# Altium PCB PCB1.PcbDoc
Units mm, origin at the board's own origin, x right, y up, seen from the top; angles counter-clockwise.
Board outline 58.8 x 70.36 mm, 2 copper layers (Top Layer, Bottom Layer); 40 components, 28 nets, 138 pads, 40 vias.
Unrouted connection lines stored in the file: 29.
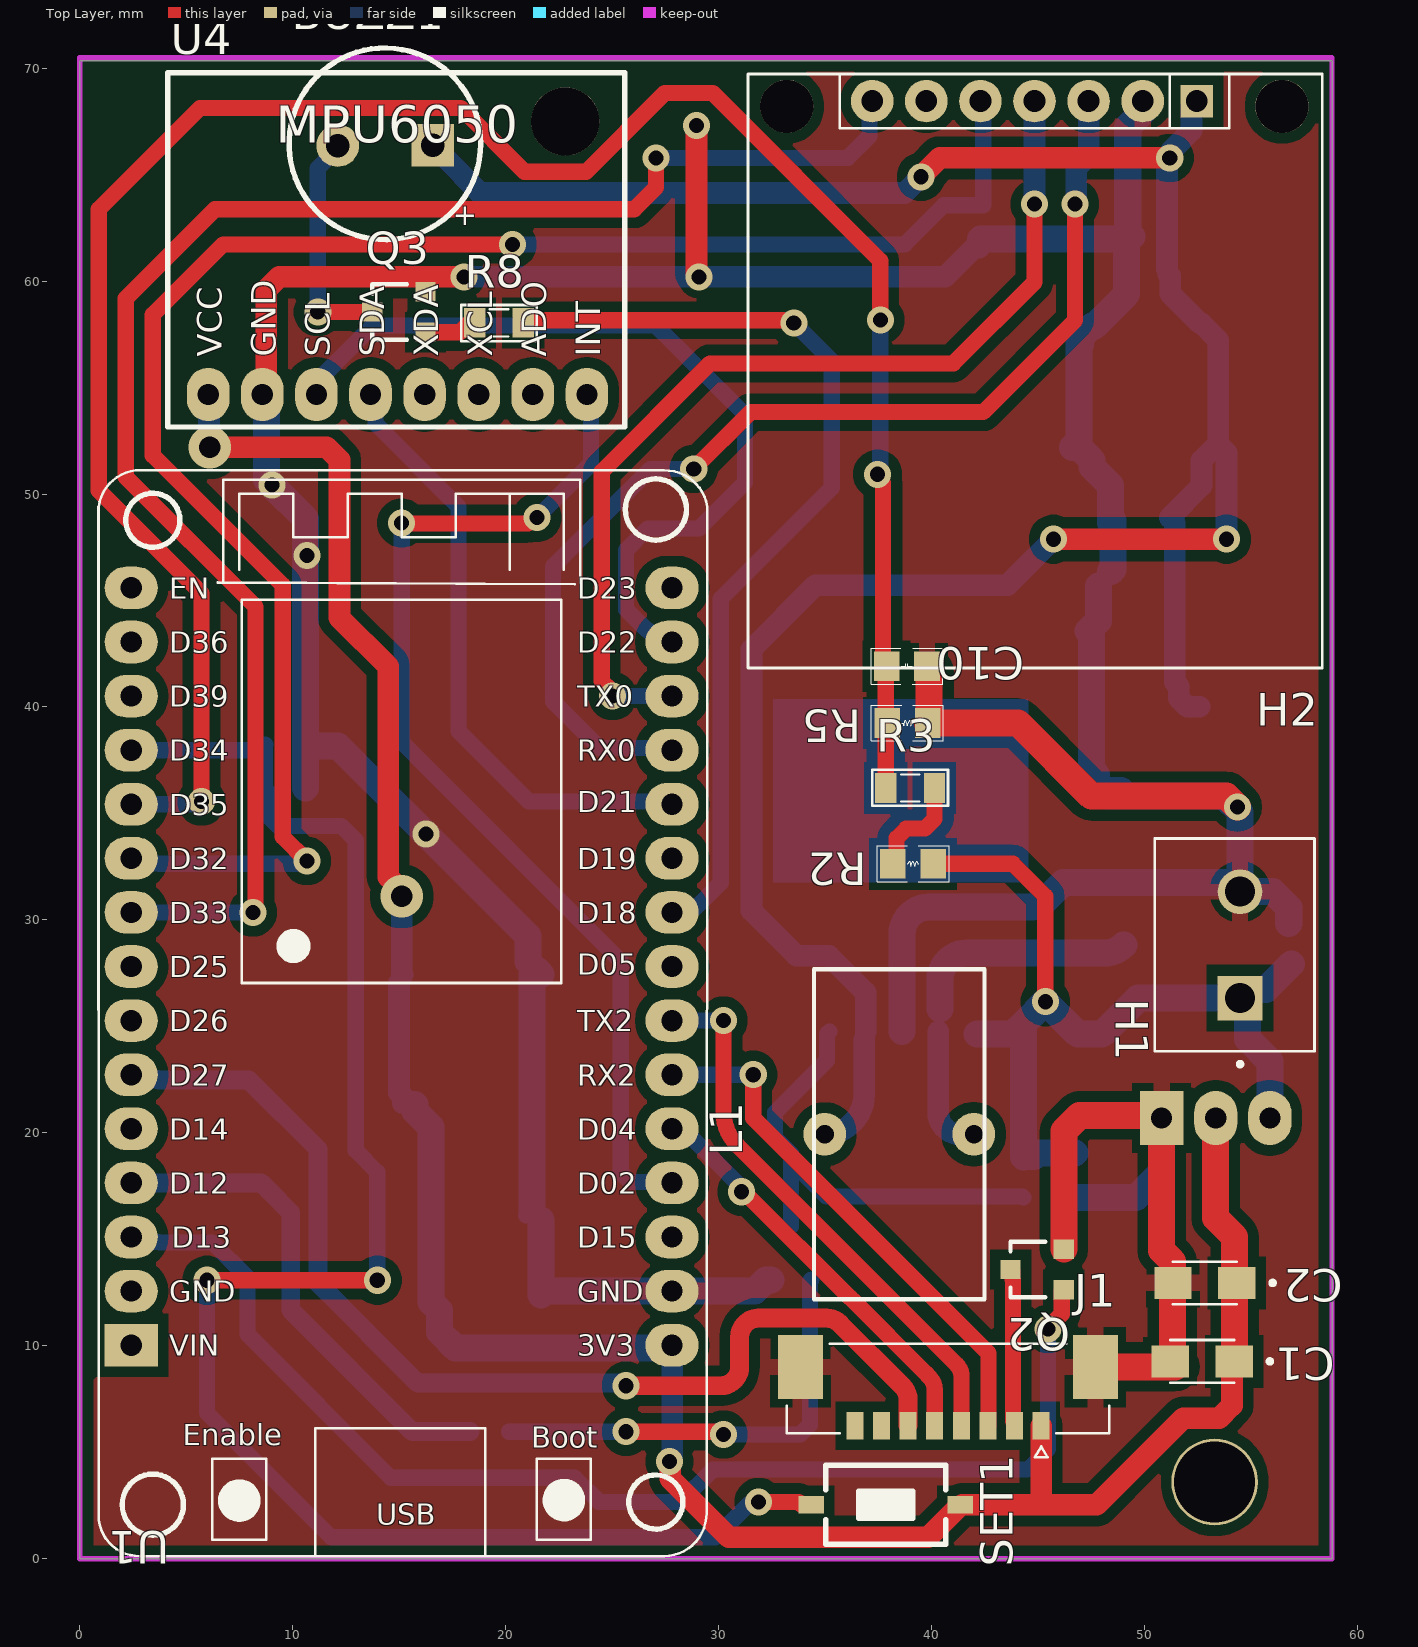
[diagram p0: Top Layer view]
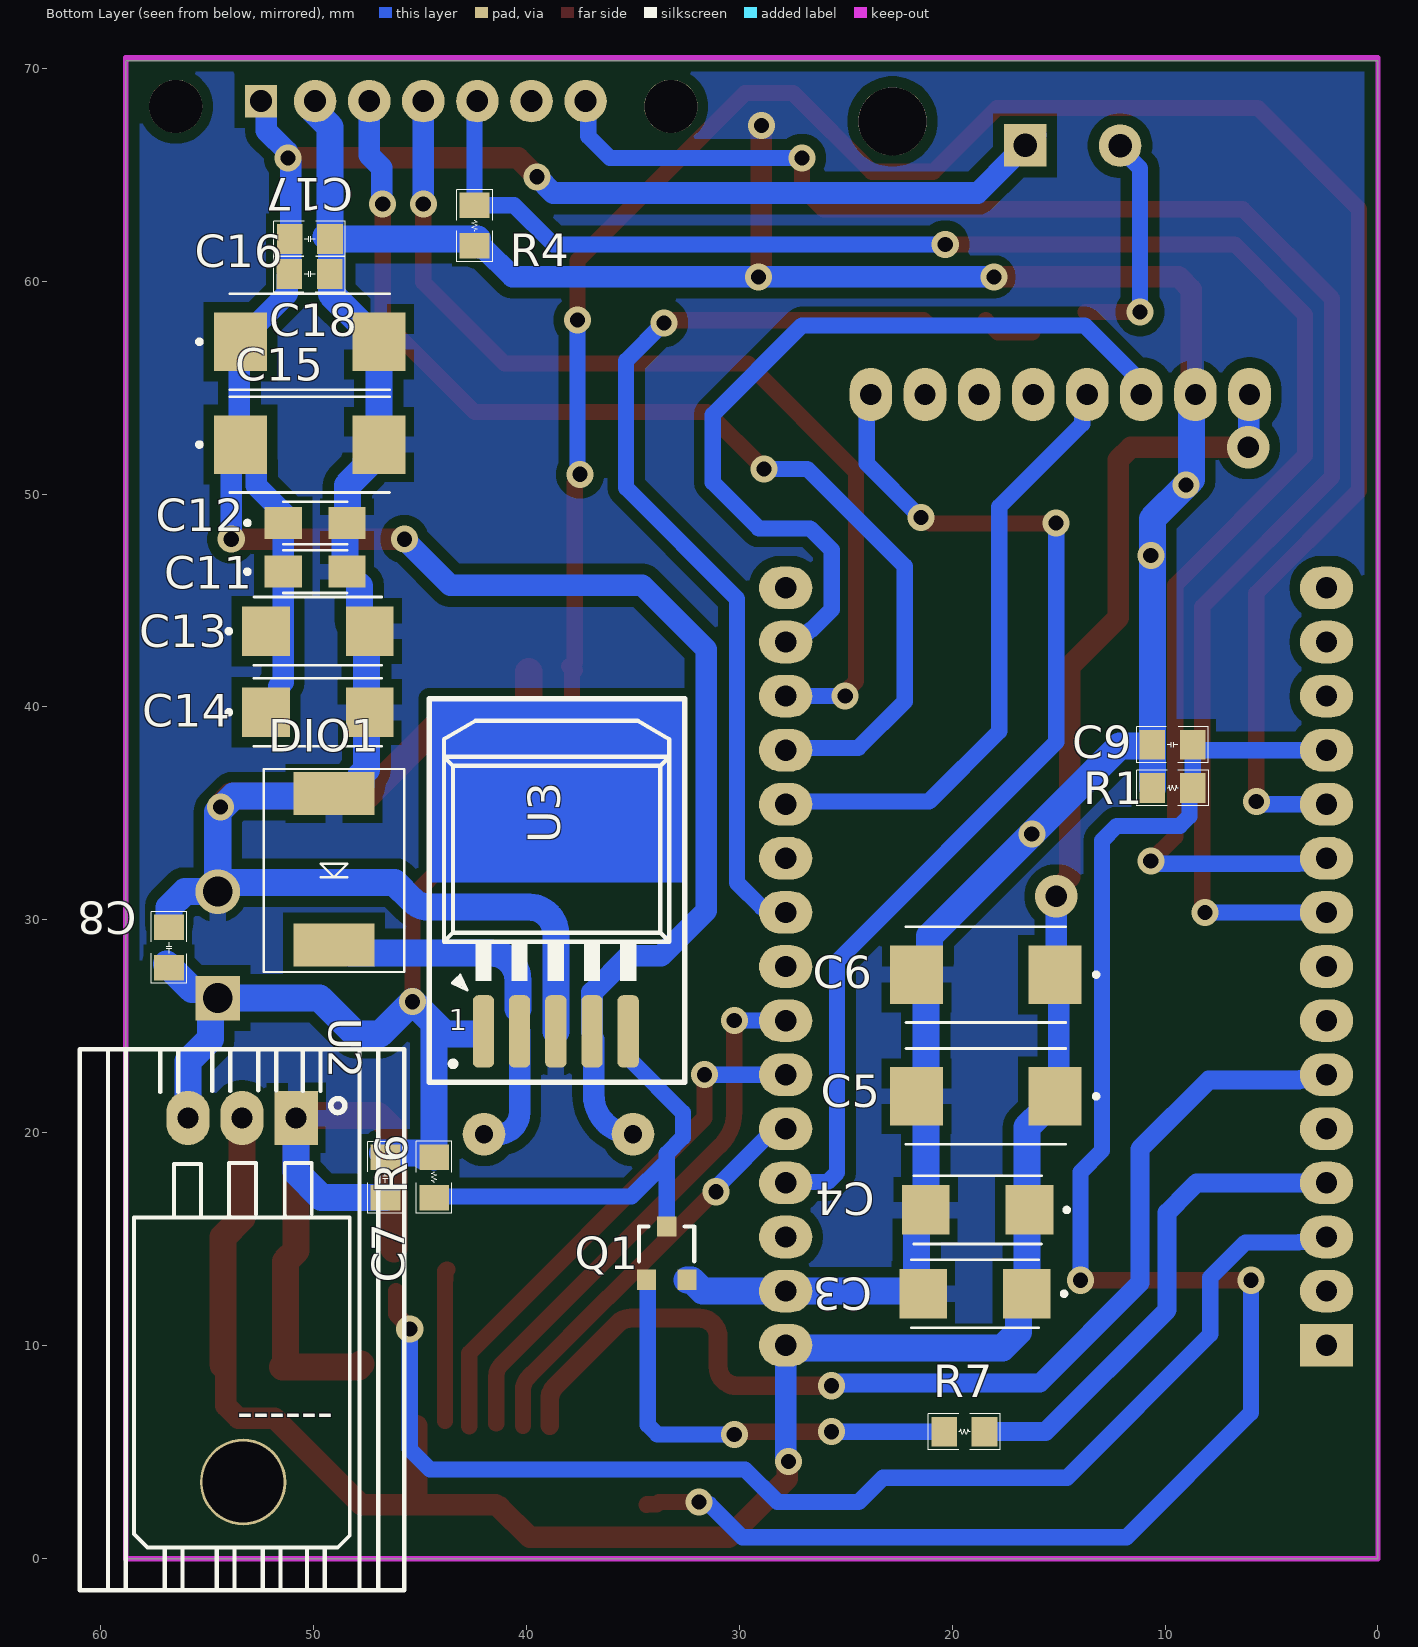
[diagram p1: Bottom Layer view, seen from below]
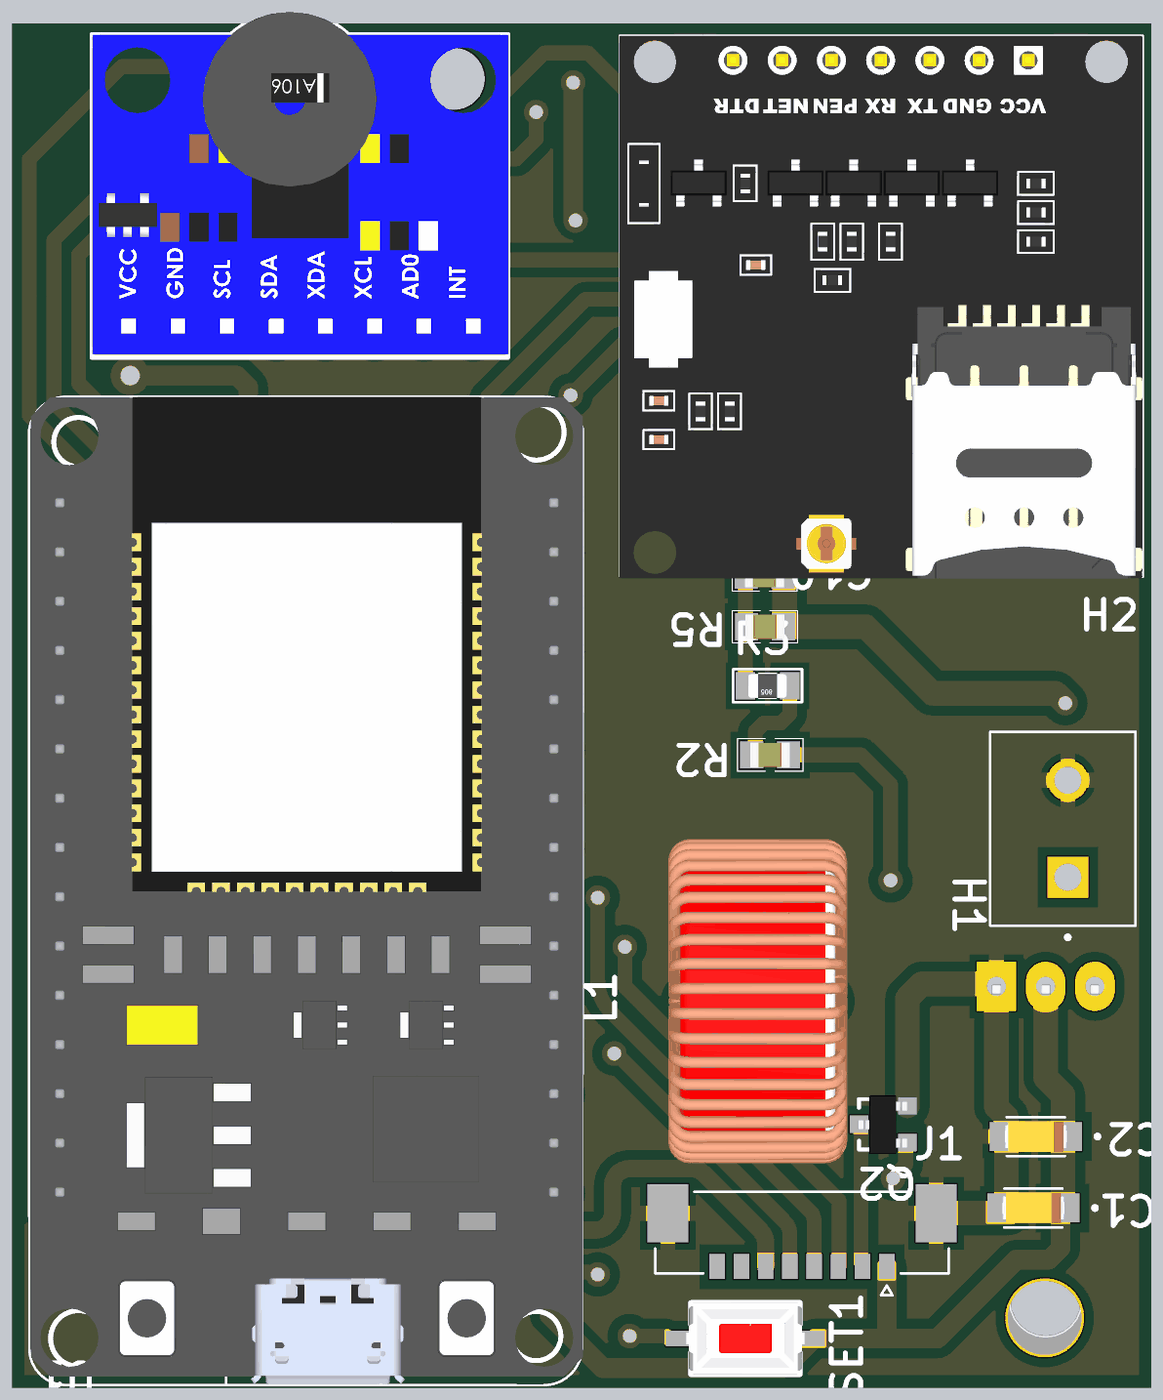
[diagram p2: 3D render of the assembled board from above, using the file's embedded part models]
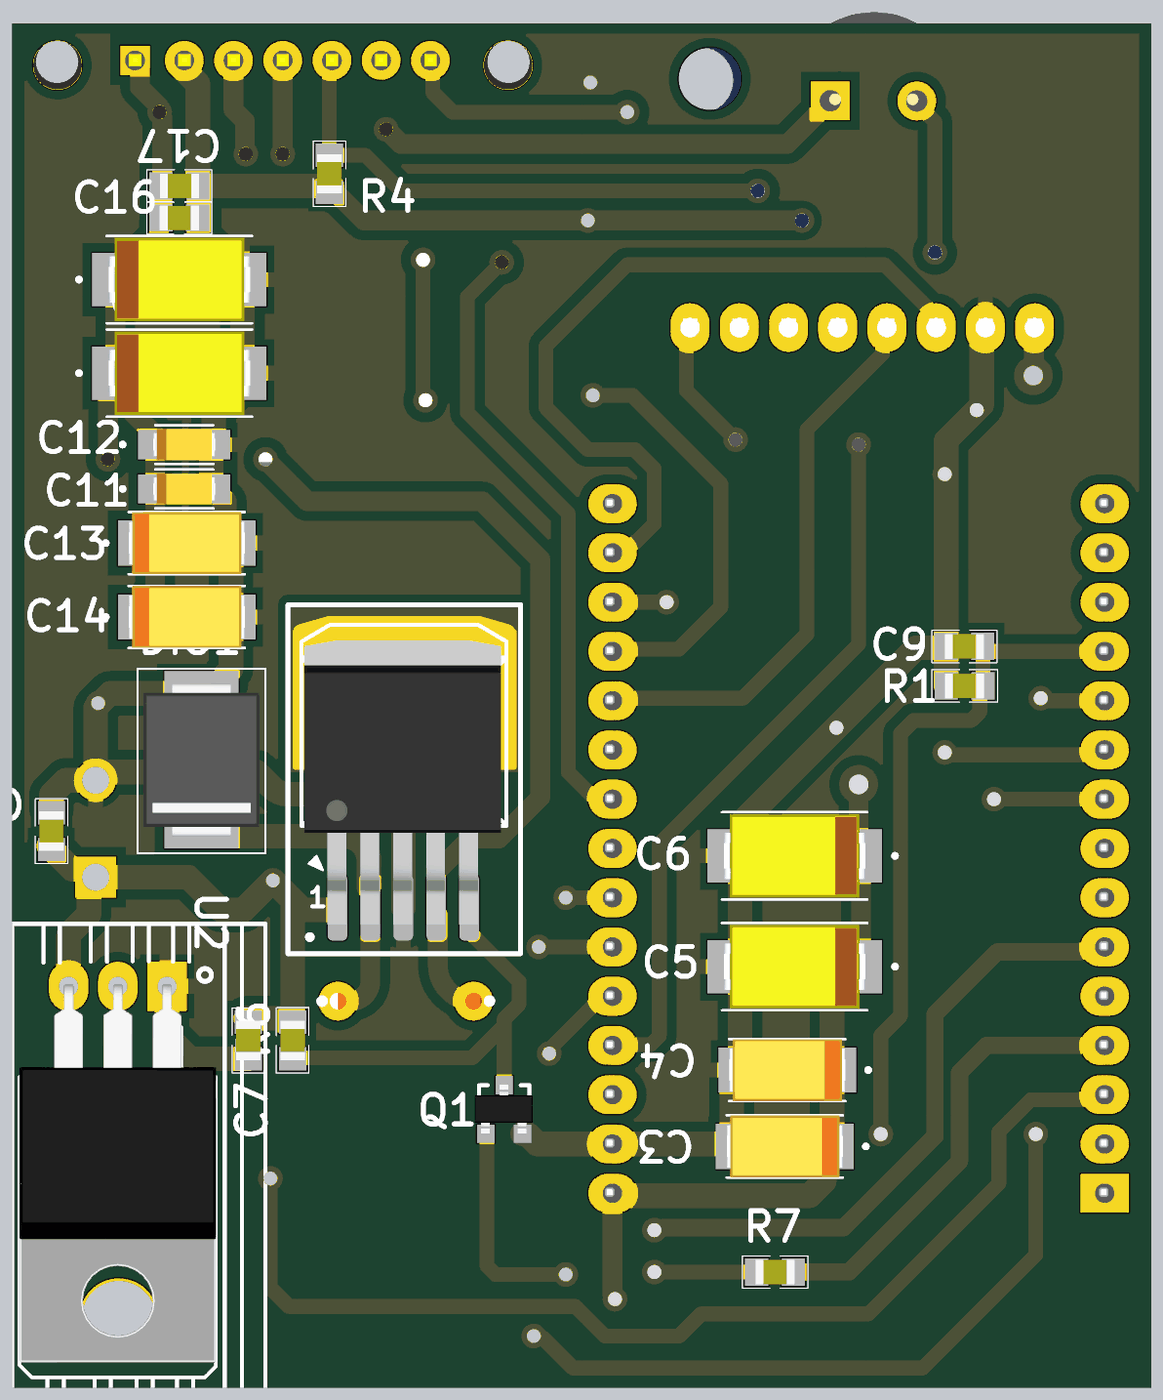
[diagram p3: 3D render of the assembled board from below, using the file's embedded part models]

## Layer stack, top to bottom
Top Solder: solder mask 0.0102, Solder Resist, Dk 3.5
Top Layer: signal copper 0.0356
Dielectric 1: dielectric 0.32, FR-4, Dk 4.8
Bottom Layer: signal copper 0.0356
Bottom Solder: solder mask 0.0102, Solder Resist, Dk 3.5

## Board outline
58.801,0 34.163,0 0,0 0,70.358 58.801,70.358

## Design rules (kind name [scope] priority, off if disabled: settings)
BoardOutlineClearance [All] p1: gap=0.2 ignorepadtopadclearanceinfootprint=FALSE
Clearance [All] p1: gap=0.508 ignorepadtopadclearanceinfootprint=FALSE except(0.25: Arc-Hole Track-Hole SMDPad-Hole THPad-Hole Via-Hole Fill-Hole Poly-Hole Region-Hole Text-Hole; 0.254: Arc-SMDPad Track-SMDPad SMDPad-SMDPad; 0.381: Arc-Arc Arc-Track Arc-THPad Arc-Via Arc-Text Track-Track Track-THPad Track-Via Track-Text SMDPad-THPad SMDPad-Via SMDPad-Text THPad-THPad THPad-Via THPad-Text Via-Via Via-Text Fill-Text Poly-Text Region-Text Text-Text)
ComponentClearance [All] p1: gap=0.127 collisioncheckmode=3 verticalgap=0.127 showdistances=TRUE
DiffPairsRouting [All] p1: maxlimit=0.254 minlimit=0.127 mostfreqgap=0.127 toplayer_minwidth=0.127 toplayer_maxwidth=25.4 toplayer_prefwidth=0.127 bottomlayer_minwidth=0.127 bottomlayer_maxwidth=25.4 bottomlayer_prefwidth=0.127 maxuncoupledlength=12.7
Height [All] p1: minheight=0 maxheight=1816.048 prefheight=12.7
HoleSize [All] p1: absolutevalues=TRUE maxlimit=6.3 minlimit=0.3 maxpercent=80.000 minpercent=20.000
HoleToHoleClearance [All] p1: gap=0.25 allowstackedmicrovias=FALSE
MinimumAnnularRing [All] p1: minimumring=0.076
MinimumSolderMaskSliver [All] p1: minsoldermaskwidth=0
PlaneClearance [All] p1: clearance=0.127
PlaneConnect PlaneConnectPowerPads [InPadClass('PowerPads')] p1: planeconnectstyle=Relief reliefexpansion=0.508 reliefentries=4 reliefconductorwidth=0.254 reliefairgap=0.254
PlaneConnect [All] p2: planeconnectstyle=Relief reliefexpansion=0.3 reliefentries=4 reliefconductorwidth=0.381 reliefairgap=0.127
PolygonConnect PolygonConnectPowerPads [All vs (InPadClass('PowerPads'))] p1: thpad.connectstyle=Direct thpad.reliefconductorwidth=0.254 thpad.reliefentries=4 thpad.polygonreliefangle="90 Angle" thpad.airgapwidth=0.254 smdpad.connectstyle=Direct smdpad.reliefconductorwidth=0.254 smdpad.reliefentries=4 smdpad.polygonreliefangle="90 Angle" smdpad.airgapwidth=0.254 via.connectstyle=Relief via.reliefconductorwidth=0.254 via.reliefentries=4 via.polygonreliefangle="90 Angle" via.airgapwidth=0.254
PolygonConnect [All] p2: thpad.connectstyle=Relief thpad.reliefconductorwidth=0.762 thpad.reliefentries=4 thpad.polygonreliefangle="90 Angle" thpad.airgapwidth=0.381 smdpad.connectstyle=Relief smdpad.reliefconductorwidth=0.762 smdpad.reliefentries=4 smdpad.polygonreliefangle="90 Angle" smdpad.airgapwidth=0.381 via.connectstyle=Direct via.reliefconductorwidth=0.762 via.reliefentries=4 via.polygonreliefangle="90 Angle" via.airgapwidth=0.381
RoutingVias [All] p1: holewidth=1 width=2 viastyle="Through Hole" minholewidth=1 minwidth=2 maxholewidth=1 maxwidth=2
SilkToSilkClearance [All] p1: silktosilkclearance=0
SilkToSolderMaskClearance [IsPad] p1: minsilkscreentomaskgap=0.025 clearancetoexposedcopper=TRUE
SolderMaskExpansion SolderMaskExpansion_Via [IsVia] p1: expansion=0.102 istentingtop=TRUE
SolderMaskExpansion [All] p2: expansion=0.075 istentingtop=FALSE
Width [All] p1: maxlimit=1.27 minlimit=0.762 preferedwidth=0.889
20 further rules are at their usual default settings.

## Components (designator, comment, footprint, x,y, rotation, side; value= is the part's Value field where it differs from the comment)
BUZZ1 "BZ 5V" BUZ_9MM 14.351,66.421 r180 top
C1 "OPT" 1206_Tantalum 52.705,9.271 r180 top
C2 "OPT" 1206_Tantalum 52.832,12.954 r180 top
C3 "OPT" 2312_Tantalum 18.923,12.446 r0 bottom
C4 "OPT" 2312_Tantalum 18.796,16.383 r0 bottom
C5 "100uF" "2917 _Tantalum" 18.415,21.717 r0 bottom
C6 "100uF" "2917 _Tantalum" 18.415,27.432 r0 bottom
C7 "10uF" 0805_Cap 46.609,17.907 r90 bottom
C8 "22uF" 0805_Cap 56.769,28.702 r90 bottom
C9 "10uF" 0805_Cap 9.652,38.227 r0 bottom
C10 "100nF" 0805_Cap 38.837,41.91 r180 top
C11 "OPT" 1206_Tantalum 49.911,46.355 r180 bottom
C12 "OPT" 1206_Tantalum 49.911,48.641 r180 bottom
C13 "OPT" 2312_Tantalum 49.784,43.561 r180 bottom
C14 "OPT" 2312_Tantalum 49.784,39.751 r180 bottom
C15 "100uF" "2917 _Tantalum" 50.165,52.324 r180 bottom
C16 "100uF" "2917 _Tantalum" 50.165,57.15 r180 bottom
C17 "100nF" 0805_Cap 50.165,61.976 r180 bottom
C18 "10uF" 0805_Cap 50.165,60.325 r0 bottom
DIO1 "Diode SMD" DIO-SMD-A 49.022,32.639 r90 bottom value=1N5007
H1 "KF301-2P" HANDSON_KF301-2P 54.483,28.829 r90 top
H2 "A7680C" "Module A7680C" 52.451,68.453 r180 top
J1 "533980871" MOLEX_533980871 40.767,8.001 r0 top
L1 "L-DIP-1" L-DIP-M-15.5x8 38.481,19.939 r180 top value="150 mH"
Q1 "Si2302DS" SOT23-132#1 33.401,14.351 r180 bottom
Q2 "Si2302DS" SOT23-132#2 44.958,13.589 r90 top
Q3 "2SC1815" SOT23-321 14.986,58.547 r90 top value=C1815
R1 "10K" 0805_Res 9.652,36.195 r180 bottom
R2 "500 ohm" 0805_Res 39.116,32.639 r0 top
R3 "15k" RES-SMD-0805 38.989,36.195 r180 top
R4 "10K" 0805_Res 42.418,62.611 r270 bottom
R5 "10k" 0805_Res 38.862,39.243 r180 top
R6 "10K" 0805_Res 44.323,17.907 r90 bottom
R7 "10k" 0805_Res 19.431,5.969 r180 bottom
R8 "330" RES-SMD-0805 19.685,58.039 r0 top
SET1 "Button 2p" "Button 2p 3x6x2.5" 37.846,2.54 r0 top
U1 "ESP32_30" ESP32_30 15.113,27.813 r0 top
U2 "LM1117-3.3V" TO220NH 50.8,20.701 r0 bottom
U3 "LM2976" TO263 38.989,30.734 r180 bottom
U4 "MPU6050" MPU6050 14.859,61.468 r0 top

## Footprints (in the part's own frame and the unit in brackets; to place one, negate y for a bottom-side part, rotate by r counter-clockwise, add the part's x,y. Pads: shape width x height; smd on the part's side, far side on the other; paste and mask are expansions set on the pad)
0805_Cap [mm]
  rect 1.2x1.4 smd: 1(-0.946,-0.003) 2(0.954,-0.003)
  silkscreen extent -1.68,-0.84 1.68,0.84, body extent -1.01,-0.64 1.01,0.63, height 0.61
0805_Res [mm]
  rect 1.2x1.4 smd: 1(-0.946,-0.003) 2(0.954,-0.003)
  silkscreen extent -1.68,-0.84 1.7,0.84, body extent -1.01,-0.64 1.01,0.63, height 0.61
1206_Tantalum [mm]
  rect 1.75x1.5 smd: 1(-1.5,0) 2(1.5,0)
  silkscreen extent -3.28,-1 1.5,1, body extent -1.6,-0.8 1.6,0.8, height 1.8
2312_Tantalum [mm]
  rect 2.24x2.32 smd: 1(-2.435,0) 2(2.435,0)
  silkscreen extent -4.28,-1.6 3,1.6, body extent -3,-1.6 3,1.6, height 2.8
"2917 _Tantalum" [mm]
  rect 2.5x2.75 smd: 1(-3.25,0) 2(3.25,0)
  silkscreen extent -5.28,-2.25 3.75,2.25, body extent -3.65,-2.15 3.65,2.15, height 3.1
"Button 2p 3x6x2.5" [mm]
  rect 1.2x0.8 smd: 1(-3.5,0) 2(3.5,0)
  silkscreen extent -2.82,-1.85 2.82,1.85, body extent -3.05,-1.85 3.05,1.85, height 2.5
BUZ_9MM [mm]
  rect 2x2 hole 1.1: 1(-2.22,0.05)
  round 2 hole 1.1: 2(2.24,0.06)
  silkscreen extent -4.47,-4.52 4.52,4.47, body extent -4.47,-4.53 4.53,4.47, height 4.8
DIO-SMD-A [mil]
  rect 80x150 smd: 1(130,0) 2(-150,0)
  silkscreen extent -200,-130 175,130, body extent -166,-118 146,118, height 84
ESP32_30 [mm] "Microcontoller Board 30 Pins Wifi 2.4GHz BLE 4.2 ESP32-WROOM-32D"
  oval 2.5x2 hole 1: 1(-12.7,17.78) 2(-12.7,15.24) 3(-12.7,12.7) 4(-12.7,10.16) 5(-12.7,7.62) 6(-12.7,5.08) 7(-12.7,2.54) 8(-12.7,0) 9(-12.7,-2.54) 10(-12.7,-5.08) 11(-12.7,-7.62) 12(-12.7,-10.16) 13(-12.7,-12.7) 14(-12.7,-15.24) 16(12.7,17.78) 17(12.7,15.24) 18(12.7,12.7) 19(12.7,10.16) 20(12.7,7.62) 21(12.7,5.08) 22(12.7,2.54) 23(12.7,0) 24(12.7,-2.54) 25(12.7,-5.08) 26(12.7,-7.62) 27(12.7,-10.16) 28(12.7,-12.7) 29(12.7,-15.24) 30(12.7,-17.78)
  rect 2.5x2 hole 1: 15(-12.7,-17.78)
  silkscreen extent -14.23,-27.69 14.35,23.31, body extent -14.15,-27.61 14.35,23.29, height 7
HANDSON_KF301-2P [mm]
  rect 2.1x2.1 hole 1.4: 1(-2.5,0)
  round 2.1 hole 1.4: 2(2.5,0)
  silkscreen extent -5.7,-3.5 5,4
L-DIP-M-15.5x8 [mm] "Body 15.5x8mm, 2 leads"
  round 2 hole 0.85: 1(-3.5,0) 2(3.5,0)
  silkscreen extent -4,-7.75 4,7.75, body extent -4.62,-8.36 4.62,8.36, height 16.84
"Module A7680C" [mm] "Footprint for A7680C"
  rect 1.52x1.52 hole 1.02: 1(0,0)
  round 2 hole 1.02: 2(2.54,0) 3(5.08,0) 4(7.62,0) 5(10.16,0) 6(12.7,0) 7(15.24,0)
  round 2.5 hole 2.5: 21(-4,0.25) 21(19.25,0.25)
  silkscreen extent -5.9,-1.28 21.07,26.62, body extent -5.88,-1.28 21.12,26.72, height 12.01
MOLEX_533980871 [mm]
  rect 0.8x1.3 smd mask+0.076: 1(4.375,-1.75) 2(3.125,-1.75) 3(1.875,-1.75) 4(0.625,-1.75) 5(-0.625,-1.75) 6(-1.875,-1.75) 7(-3.125,-1.75) 8(-4.375,-1.75)
  rect 2.1x3 smd mask+0.076: S1(-6.925,1) S2(6.925,1)
  silkscreen extent -7.57,-3.23 7.57,2.1
MPU6050 [mm] "IMU ACCEL/GYRO 3-AXIS I2C"
  oval 2x2.5 hole 1: 1(-8.826,-6.794) 2(-6.286,-6.794) 3(-3.746,-6.794) 4(-1.206,-6.794) 5(1.333,-6.794) 6(3.873,-6.794) 7(6.413,-6.794) 8(8.954,-6.794)
  round 3.2 hole 3.2 unplated: ""(7.938,6.033)
  silkscreen extent -10.73,-8.32 10.73,8.32, body extent -10.73,-8.19 10.77,8.31, height 5.69
RES-SMD-0805 [mil]
  rect 39.37x55 smd: 1(-45,0) 2(45,0)
  silkscreen extent -70,-34 70,33, body extent -39,-25 39,25, height 31
SOT23-132#1 [mm]
  rect 0.9x0.95 smd: 1(-0.95,-1.25) 3(0,1.25)
  rect 0.9x0.95 smd mask+0: 32(0.95,-1.25)
  silkscreen extent -1.3,-0.38 1.3,1.25, body extent -1.52,-1.23 1.48,1.27, height 1.06
SOT23-132#2 [mm]
  rect 0.9x0.95 smd: 1(-0.95,-1.25) 3(0,1.25)
  rect 0.9x0.95 smd mask+0: 2(0.95,-1.25)
  silkscreen extent -1.3,-0.38 1.3,1.25, body extent -1.52,-1.23 1.48,1.27, height 1.06
SOT23-321 [mm]
  rect 0.9x0.95 smd mask+0: 1(0.95,-1.25)
  rect 0.9x0.95 smd: 2(0,1.25) 3(-0.95,-1.25)
  silkscreen extent -1.3,-0.38 1.3,1.25, body extent -1.52,-1.23 1.48,1.27, height 1.06
TO220NH [mil] "TO-220 - 1-2-3"
  rect 80x100 hole 39: 1(0,0)
  oval 80x100 hole 39: 2(100,0) 3(200,0)
  round 160 hole 150: H(98,673)
  silkscreen extent -200,-127 400,873, body extent -100,-4 300,764, height 165
TO263 [mm]
  rrect50% 1x3.4 smd: 1(-3.019,-5.969) 2(-1.319,-5.969) 4(2.081,-5.969) 5(3.781,-5.969)
  rrect50% 1x3.4 smd mask+0: 3(0.381,-5.969)
  Top Layer region: -5.568,9.65 6.432,9.65 6.432,1.016 -5.568,1.016
  silkscreen extent -5.57,-8.35 6.43,9.65, body extent -4.73,-6.84 5.43,7.8, height 4.57

## Part data
BUZZ1: library part "Buzzer 5V 9mm (THD)", "Buzzers Transducer, Externally Driven Magnetic 5V 80mA 2.73kHz 85dB @ 5V, 10cm Through Hole PC Pins", PartNumber=CST-951AP
C1 C2 C3 C4 C5 C6 C11 C12 C13 C14 C15 C16: library part Tantalum, "Molded Tantalum Capacitors"
C7 C8: library part "Ceramic Capacitor_1", Chung_Loai=Dán, Don_Vi=Con, Ma_Hang=MH004551, So_Chan=2, Ten_Linh_Kien="Tụ 0805 104-100nF 10% 50V"
C9 C10 C17 C18: library part "Ceramic Capacitor", Chung_Loai=Dán, Don_Vi=Con, Ma_Hang=MH004551, So_Chan=2, Ten_Linh_Kien="Tụ 0805 104-100nF 10% 50V"
DIO1: "Default Diode", Code - JEDEC=DO-214-AB, Published=8-Jun-2000, Publisher="Altium Limited", Revision="July-2002: Re-released for DXP Platform."
H1: "2 Pin Terminal Block 5mm Pitch", Package=None, Availability=Unavailable, MP=KF301-2P, Price=None
H2: library part "Module A7680C", "SIM Module A7680C; A7672S 4G"
J1: "MX 1.25mm 8 pin;Conn; Rect; Header; 1.25 mm Pitch; PCB; 8 Cir; Ver; SMT; PicoBlade; LF", Package=None, Availability=Unavailable, MP=533980871, Price=None
L1: "Inductor"
Q1 Q2: "N-Channel MOSFET", LatestRevisionDate=17-Jul-2002, LatestRevisionNote="Re-released for DXP Platform.", PackageDescription="TO, Flat Index; 3 In-Line, Axial Leads; Body Dia. 4.6mm; Lead Dia. 0.5 mm (max)", PackageReference=E3, PackageVersion=1995/1996, Published=8-Jun-2000, Publisher="Altium Limited"
Q3: "NPN 600mW, ECB"
R1 R2 R4 R5 R6 R7: library part Resistor, Chung_Loai=Dán, Don_Vi=Con, Ma_Hang=MH005468, So_Chan=2, Ten_Linh_Kien="Trở 0805 1% 1k"
R3 R8: library part Res-SMD, "Resistor", Manufacturer="Generic Components", Class=Passive, Published=08/06/2000, Publisher="Altium Hobart Technology Centre"
SET1: "Nut Nhan 2 Chan SMD 3x6x2.5", Ma_Hang=MH001036, Ten="Nút Nhấn 2 Chân 3x6x2.5MM SMD"
U1: "Microcontoller Board 30 Pins Wifi 2.4GHz BLE 4.2 ESP32-WROOM-32D", ComponentLink1Description=Datasheet, ComponentLink1URL=https://www.mouser.com/datasheet/2/891/esp32_wroom_32d_esp32_wroom_32u_datasheet_en-1365844.pdf
U2: library part LM1117, "800mA Low-Dropout Linear Regulator", Creator="Nguyen Ba Bien", Website=http://group3i.net
U3: library part LM2596, Max Input Voltage="12 V", Max Output Current="3 (6.0 peak) A", Max Output Voltage=mV, Temperature Range="-40 to +125 degC", Category=IC-Power, Min Input Voltage=mV, Min Output Voltage=mV, Mounting Technology="Surface Mount", Status=Unreleased, Supply Voltage=mV
U4: "IMU ACCEL/GYRO 3-AXIS I2C", ComponentLink1Description=Datasheet, ComponentLink1URL=https://invensense.tdk.com/wp-content/uploads/2015/02/MPU-6000-Datasheet1.pdf

## Via types
v1: diameter 1.27, hole 0.711, Top Layer to Bottom Layer, tented both sides, 38 vias
v2: diameter 2, hole 1, Top Layer to Bottom Layer, tented both sides, 2 vias

## Nets (pads, with @x,y where several pads share a name; then routed paths per layer and width w, separated by ;. In a path a pad name is that pad's centre, name@x,y a point inside that pad or via, vN(x,y) a via of type N, cw(c..) or ccw(c..) an arc to the next point about the centre after c; other vN are vias at no path point)
3V3: C1.1 C2.1 C3.1 C4.1 C5.1 C6.1 J1.1 SET1.2 U1.30 U2.2 U4.1 | length 116.3
  Top Layer w1.016: v2(6.096,52.197) 11.597,52.197 12.192,51.602 12.192,44.196 14.478,41.91 14.478,32.016 15.113,31.381 v2(15.113,31.115) ; v1(27.686,4.572) 27.735,4.523 27.735,3.761 30.48,1.016 39.838,1.016 SET1.2@41.254,2.432 ; SET1.2@41.438,2.54 47.752,2.54 51.816,6.604 53.507,6.604 54.102,7.199 54.102,9.029 C1.1@54.332,9.029 ; J1.1 45.142,2.737 45.212,2.667
  Top Layer w1.27: U2.2 53.34,16.002 54.229,15.113 C1.1@54.229,9.144
  Bottom Layer w1.016: U4.1@5.969,54.483 6.064,54.388 6.064,52.229 v2(6.096,52.197) ; C6.1@14.986,27.051 14.986,21.896 C5.1 ; v2(15.113,31.115) 15.113,27.484 C6.1 ; C5.1@15.165,21.388 C5.1@15.329,21.552 ; C3.1@16.51,12.319 C3.1@16.615,12.214 ; v1(27.686,4.572) 27.686,4.641 27.813,4.768 27.813,9.906 U1.30@28.321,9.906 ; U1.30@27.686,9.906 U1.30
  Bottom Layer w1.27: C5.1@15.748,21.336 15.748,21.009 16.488,20.269 16.488,16.383 16.488,12.065 16.891,11.662 16.891,10.65 17.635,9.906 U1.30@27.559,9.906
5V: BUZZ1.1 C11.1 C12.1 C13.1 C14.1 C15.1 C16.1 C17.1 C18.2 H2.1 L1.2 U3.4 | length 123.7
  Top Layer w1.016: v1(39.497,64.897) 40.386,65.786 v1(51.181,65.786) ; v1(45.72,47.879) v1(53.848,47.879)
  Bottom Layer w1.016: BUZZ1.1@16.079,66.863 16.267,66.675 BUZZ1.1@16.637,66.675 ; BUZZ1.1 17.063,65.879 18.807,64.135 38.726,64.135 39.488,64.897 v1(39.497,64.897) ; L1.2 ccw(c34.981,21.788) 36.83,21.788 U3.4@36.83,24.384 ; U3.4 36.908,26.592 35.179,28.321 33.655,28.321 31.541,30.435 31.541,42.717 34.544,45.72 43.561,45.72 v1(45.72,47.879) ; C18.2@51.054,60.579 51.054,65.59 51.181,65.717 v1(51.181,65.786) 51.23,65.835 51.23,66.089 52.201,67.06 52.201,68.203 H2.1 ; C18.2 51.211,60.236 51.211,59.406 52.6,58.017 52.673,58.017 53.467,57.223 C16.1@53.467,57.15 ; C12.1@51.181,48.895 52.673,50.387 52.673,51.582 C15.1 ; C12.1 C11.1 51.411,41.172 51.607,40.976 51.607,40.403 52.005,40.005 C14.1@52.578,40.005 ; C16.1 53.467,57.098 C15.1@53.467,52.197 ; C15.1@53.594,52.197 53.848,51.943 v1(53.848,47.879)
buzzer: R8.2 U1.22 | length 44.5
  Top Layer w0.762: R8.2@21.209,58.039 21.336,58.166 33.042,58.166 33.072,58.136 33.431,58.136 v1(33.528,58.039)
  Bottom Layer w0.762: U1.22 28.05,30.59 28.939,30.59 30.099,31.75 30.099,45.085 35.306,50.292 35.306,56.261 v1(33.528,58.039)
GND: C1.2 C2.2 C3.2 C4.2 C5.2 C6.2 C7.1 C8.2 C9.2 C10.1 C11.2 C12.2 C13.2 C14.2 C15.2 C16.2 C17.2 C18.1 DIO1.1 H1.2 H2.2 J1.S1 J1.S2 Q1.32 Q2.2 Q3.1 R1.1 R4.2 R5.1 U1.29 U2.1 U3.3 U4.2 | length 241.6
  Top Layer w1.016: U4.2 8.761,54.862 8.761,55.808 8.763,55.81 8.763,59.603 9.358,60.198 v1(18.034,60.198) ; v1(28.956,67.31) 28.956,60.394 29.083,60.267 v1(29.083,60.198)
  Top Layer w1.27: C10.1@39.878,41.656 39.878,39.768 39.843,39.733 39.843,39.281 R5.1 44.066,39.246 47.498,35.814 53.848,35.814 v1(54.356,35.306) ; Q2.2 46.208,20.084 46.952,20.828 U2.1@50.673,20.828 ; J1.S2@47.752,9.144 47.879,9.017 C1.2@51.332,9.017 ; U2.1 50.8,14.478 51.308,13.97 51.308,9.132 51.423,9.017 C1.2@51.435,9.017
  Bottom Layer w0.762: C4.2@20.955,16.129 C4.2@21.231,16.129
  Bottom Layer w1.016: v1(18.034,60.198) v1(29.083,60.198) 40.64,60.198 42.007,61.565 42.229,61.565 R4.2@42.229,61.722
  Bottom Layer w1.27: U4.2@8.763,54.356 8.712,54.305 8.712,53.768 8.763,53.717 8.763,50.673 v1(9.017,50.419) 10.598,48.838 10.598,47.117 10.598,38.2 R1.1 ; C9.2 10.606,38.2 10.641,38.165 12.127,38.165 v1(16.256,34.036) 21.05,29.242 21.05,28.047 C6.2 ; C4.2 21.231,21.717 C6.2@21.231,27.432 ; C4.2@21.665,15.909 21.665,12.395 21.843,12.573 31.707,12.573 32.235,13.101 Q1.32 ; U3.3 38.608,29.34 cw(c39.878,29.337) 39.875,30.607 44.557,30.607 ccw(c44.557,31.75) 45.365,30.941 46.174,31.75 H1.2@54.356,31.75 ; R4.2@42.291,61.976 42.294,61.973 C17.2 49.211,67.245 H2.2@49.911,67.945 ; C7.1 49.6,16.961 50.8,18.161 U2.1 ; C15.2@46.609,52.197 46.917,52.197 47.53,51.584 47.53,51.276 48.398,50.408 48.398,48.654 C12.2 ; C15.2 46.915,56.948 C16.2@46.99,57.023 ; C16.2 46.915,57.275 47.53,57.89 47.655,57.89 49.149,59.384 49.149,61.849 C17.2@49.403,62.103 ; C13.2 C13.2@47.498,43.71 ; C11.2@47.834,45.675 47.834,44.046 C13.2@47.498,43.71 ; DIO1.1@48.26,35.814 53.739,35.814 ; C11.2 48.514,46.458 C12.2@48.514,48.768 ; DIO1.1@48.895,35.814 53.739,35.814 ; DIO1.1 48.895,36.068 48.006,36.068 47.752,36.322 47.752,36.812 47.498,37.066 C13.2@47.498,43.71 ; C8.2@56.769,29.845 56.769,30.585 56.025,31.329 H1.2 54.483,35.07 53.739,35.814
  other v1: 10.668,47.117
NetBUZZ1_2: BUZZ1.2 Q3.2 | length 10.7
  Top Layer w0.762: v1@11.196,58.547 Q3.2
  Bottom Layer w0.762: v1(11.176,58.547) 11.176,65.296 12.111,66.231 BUZZ1.2
NetC9_1: C9.1 R1.2 SET1.1 U1.4 | length 81.2
  Top Layer w0.762: v1(5.969,13.081) v1(13.97,13.081) v1@14.097,13.081 ; v1(31.877,2.667) 33.758,2.667 33.866,2.559 34.327,2.559 SET1.1
  Bottom Layer w0.762: U1.4 C9.1@8.702,37.973 ; v1@5.861,12.954 5.969,12.846 5.969,6.858 11.811,1.016 29.845,1.016 31.399,2.57 31.78,2.57 v1(31.877,2.667) ; C9.1 8.702,38.226 C9.1@8.702,37.973 ; v1(13.97,13.081) 13.97,18.161 12.954,19.177 12.954,33.733 12.27,34.417 9.303,34.417 8.857,34.863 8.857,35.974 8.702,36.129 C9.1@8.702,37.973
NetC10_2: C10.2 R3.2 R5.2 U1.5 | length 103.2
  Top Layer w0.762: v1(5.715,35.56) 5.715,45.339 0.889,50.165 0.889,63.373 5.649,68.133 17.887,68.133 20.881,65.139 23.775,65.139 27.47,68.834 29.718,68.834 37.592,60.96 v1(37.592,58.166) ; v1(37.465,50.927) 37.465,50.79 37.719,50.536 37.719,42.077 C10.2 ; C10.2@37.719,41.725 C10.2@37.908,41.913 ; R3.2 37.846,41.783 C10.2@37.973,41.91
  Bottom Layer w0.762: U1.5 5.588,35.433 v1(5.715,35.56) v1@5.842,35.56 ; v1(37.465,50.927) 37.562,51.024 37.562,51.383 37.592,51.413 v1@37.592,58.039
NetDIO1_2: DIO1.2 L1.1 U3.2 | length 16.9
  Bottom Layer w1.016: U3.2 40.308,20.955 ccw(c41.324,20.955) 41.324,19.939 L1.1
  Bottom Layer w1.27: U3.2@40.386,25.83 40.386,27.181 cw(c41.656,27.178) 41.653,28.448 48.115,28.448 ccw(c48.115,29.718) 49.013,28.82 DIO1.2
NetH2_3: H2.3 U1.19 | length 52.7
  Top Layer w0.762: v1(28.829,51.181) 31.496,53.848 42.418,53.848 46.736,58.166 v1(46.736,63.624)
  Bottom Layer w0.762: U1.19@27.813,38.079 24.405,38.079 22.225,40.259 22.225,46.609 26.797,51.181 v1(28.829,51.181)
  Bottom Layer w1.016: v1(46.736,63.624) 46.785,63.672 46.785,65.327 47.371,65.913 H2.3
NetH2_4: H2.4 U1.18 | length 46.9
  Top Layer w0.762: v1(25.019,40.513) 25.019,40.65 24.765,40.904 24.765,40.959 24.511,41.213 24.511,51.054 29.591,56.134 41.021,56.134 44.831,59.944 v1(44.831,63.624)
  Bottom Layer w0.762: v1(25.019,40.513) U1.18@28.681,40.513
  Bottom Layer w1.016: v1(44.831,63.624) H2.4
NetH2_5: H2.5 R4.1 U1.6 | length 83.1
  Top Layer w0.762: v1(10.668,32.766) 9.525,33.909 9.525,45.72 3.429,51.816 3.429,58.42 6.731,61.722 v1(20.32,61.722)
  Bottom Layer w0.762: U1.6 2.65,32.656 3.711,32.656 3.728,32.639 10.404,32.639 10.433,32.669 10.638,32.669 v1@10.668,32.639 ; v1(20.32,61.722) 38.735,61.722 40.57,63.557 R4.1 42.421,68.323 H2.5
NetH2_6: H2.6
NetH2_7: H2.7 U1.7 | length 77.7
  Top Layer w0.762: v1@8.255,30.492 8.225,30.522 8.225,30.809 8.255,30.839 8.255,44.704 2.159,50.8 2.159,59.182 6.35,63.373 26.035,63.373 27.051,64.389 v1(27.051,65.786)
  Bottom Layer w0.762: U1.7 v1(8.128,30.353) v1@8.255,30.353 ; v1(27.051,65.786) 36.068,65.786 37.084,66.802 37.084,68.326 H2.7
NetJ1_2: J1.2 Q2.3 | length 7.2
  Top Layer w0.762: Q2.3 43.733,13.589 43.802,13.52 43.802,13.109 43.815,13.096 J1.2@43.815,6.477
NetJ1_3: J1.3 U1.25 | length 24.9
  Top Layer w0.762: v1(31.623,22.733) 31.623,20.701 42.672,9.652 J1.3@42.672,6.223
  Bottom Layer w0.762: U1.25 v1(31.623,22.733)
NetJ1_4: J1.4 U1.24 | length 25.8
  Top Layer w0.762: v1(30.226,25.273) 30.226,21.002 ccw(c32.478,20.999) 30.899,19.393 30.9,19.392 41.179,9.113 cw(c40.64,8.574) 41.402,8.574 J1.4@41.402,6.35
  Bottom Layer w0.762: U1.24 v1(30.226,25.273)
NetJ1_5: J1.5 U1.26 | length 19.4
  Top Layer w0.762: v1(31.08,17.237) 31.083,17.236 cw(c30.826,16.518) 31.366,17.055 36.105,12.317 ccw(c36.645,12.854) 36.174,12.255 cw(c35.433,11.303) 36.288,12.154 39.744,8.698 cw(c38.892,7.844) 39.845,8.584 ccw(c40.443,9.056) 39.903,8.519 39.919,8.503 cw(c39.38,7.964) 40.142,7.966 40.142,7.964 J1.5
  Bottom Layer w0.762: U1.26 28.321,20.193 30.982,17.532 30.982,17.334 v1(31.08,17.237)
NetJ1_6: J1.6 U1.10 | length 51.6
  Top Layer w0.889: v1(25.654,8.128) 30.099,8.128 ccw(c30.099,9.017) 30.988,9.017 30.988,10.414 cw(c31.877,10.414) 31.877,11.303 35.065,11.303 cw(c35.065,10.414) 35.692,11.044 38.633,8.103 cw(c38.003,7.476) 38.892,7.478 38.892,7.476 J1.6
  Bottom Layer w0.889: U1.10 2.626,22.52 3.661,22.52 3.703,22.479 7.946,22.479 11.176,19.249 11.176,12.954 15.875,8.255 25.258,8.255 25.312,8.201 25.581,8.201 v1(25.654,8.128)
NetQ1_1: Q1.1 R7.1 | length 21.2
  Top Layer w0.762: v1(25.654,5.969) 29.962,5.969 30.089,5.842 v1(30.226,5.842)
  Bottom Layer w0.762: R7.1@20.158,5.969 v1(25.654,5.969) ; v1(30.226,5.842) 33.844,5.842 34.29,6.288 34.29,13.04 Q1.1
NetQ1_3: Q1.3 R6.1 U3.5 | length 22.2
  Bottom Layer w0.762: Q1.3 33.401,18.669 ; U3.5 35.089,24.646 35.089,23.405 32.639,20.955 32.639,19.789 33.401,19.027 33.401,18.669 ; R6.1 44.263,17.018 35.052,17.018 33.401,18.669
NetQ2_1: Q2.1 U1.13 | length 58.5
  Top Layer w0.762: v1(45.466,10.795) 45.466,10.847 46.114,11.495 46.114,12.57 Q2.1@46.117,12.573
  Bottom Layer w0.762: U1.13 2.65,14.876 3.711,14.876 3.728,14.859 6.223,14.859 7.874,13.208 7.874,10.541 14.605,3.81 23.241,3.81 24.384,2.667 28.194,2.667 29.718,4.191 44.512,4.191 45.466,5.145 v1(45.466,10.795)
NetQ3_3: Q3.3 R8.1 | length 2.4
  Top Layer w0.762: Q3.3 17.846,57.597 R8.1@18.415,58.166
NetR2_1: R2.1 R3.1 | length 4.6
  Top Layer w0.762: R2.1 38.355,32.82 38.355,33.844 38.801,34.29 39.686,34.29 40.132,34.736 R3.1@40.132,35.941
NetR7_2: R7.2 U1.12 | length 23.4
  Bottom Layer w0.889: U1.12 8.509,17.653 8.889,17.273 9.906,16.256 9.906,11.684 15.621,5.969 R7.2@18.321,5.969
NetU1_17: U1.17 U4.3 | length 38.8
  Bottom Layer w0.762: U4.3@10.971,55.118 13.765,57.912 27.051,57.912 31.242,53.721 31.242,50.546 29.083,48.387 26.67,48.387 25.654,47.371 25.654,44.577 26.617,43.614 26.667,43.614 27.228,43.053 U1.17
NetU1_20: U1.20 U4.4 | length 28.4
  Bottom Layer w0.762: U4.4@13.589,53.975 13.767,53.975 13.889,53.852 13.889,53.294 17.78,49.403 17.78,38.862 21.082,35.56 27.686,35.56 U1.20
NetU1_27: U1.27 U4.8 | length 50.4
  Top Layer w0.762: v1(15.113,48.641) 15.143,48.611 21.042,48.611 21.326,48.895 v1(21.463,48.895)
  Bottom Layer w0.762: v1(15.113,48.641) 15.113,38.354 25.4,28.067 25.4,18.143 25.846,17.697 27.769,17.697 U1.27 ; v1(21.463,48.895) 24.003,51.435 U4.8@24.003,54.356
VCC: C7.2 C8.1 H1.1 R2.2 R6.2 U2.3 U3.1 | length 43.5
  Top Layer w0.762: R2.2@40.035,32.639 43.815,32.639 45.339,31.115 v1(45.339,26.162)
  Bottom Layer w1.27: U3.1@42.143,24.638 43.815,24.638 44.32,25.143 ; C7.2@46.736,19.05 44.96,19.05 44.806,18.896 44.355,18.896 R6.2 44.32,25.143 ; U2.3@55.88,20.447 U2.3 55.88,23.368 54.828,24.42 54.828,25.984 H1.1 ; C8.1@56.896,27.94 55.7,26.744 54.898,26.744 H1.1 ; 44.32,25.143 v1(45.339,26.162) 46.863,24.638 48.006,24.638 49.697,26.329 H1.1
pads on no net: H2.21 J1.7 J1.8 U1.1 U1.2 U1.3 U1.8 U1.9 U1.11 U1.14 U1.15 U1.16 U1.21 U1.23 U1.28 U2.H U4. U4.5 U4.6 U4.7

## Polygon pours and split planes (outlines as drawn)
GND on Top Layer "GND_L01_P000" (solid, remove dead copper, pour order 0): 58.801,0 34.163,0 0,0 0,70.358 58.801,70.358
GND on Bottom Layer "GND_L02_P001" (solid, remove dead copper, pour order 1): 58.801,0 34.163,0 0,0 0,70.358 58.801,70.358

## Keep-outs
Keep-Out Layer:
  lines w0.254: 0,0 0,70.485 58.801,70.485 58.801,0 0,0

## Text inside footprints (layer, text, board x,y; h text height)
BUZZ1: Top Overlay "+" at 18.669,63.5 h1 r180
U1: Top Overlay "Enable" at 4.826,5.334 h1; Top Overlay "Boot" at 21.209,5.207 h1; Top Overlay "USB" at 13.913,1.603 h1; Top Overlay "EN" at 4.191,45.085 h1; Top Overlay "D23" at 23.368,45.085 h1; Top Overlay "D36" at 4.191,42.545 h1; Top Overlay "TX2" at 23.368,24.765 h1; Top Overlay "RX2" at 23.368,22.225 h1; Top Overlay "D15" at 23.368,14.605 h1; Top Overlay "D02" at 23.368,17.145 h1; Top Overlay "GND" at 23.368,12.065 h1; Top Overlay "D04" at 23.368,19.685 h1; Top Overlay "3V3" at 23.368,9.525 h1; Top Overlay "D39" at 4.191,40.005 h1; Top Overlay "D12" at 4.191,17.145 h1; Top Overlay "VIN" at 4.191,9.525 h1; Top Overlay "GND" at 4.191,12.065 h1; Top Overlay "D14" at 4.191,19.685 h1; Top Overlay "D27" at 4.191,22.225 h1; Top Overlay "D13" at 4.318,14.605 h1; Top Overlay "D26" at 4.191,24.765 h1; Top Overlay "D32" at 4.191,32.385 h1; Top Overlay "D34" at 4.191,37.465 h1; Top Overlay "D35" at 4.191,34.925 h1; Top Overlay "D33" at 4.191,29.845 h1; Top Overlay "D25" at 4.191,27.305 h1; Top Overlay "D19" at 23.368,32.385 h1; Top Overlay "D05" at 23.368,27.432 h1; Top Overlay "D18" at 23.368,29.845 h1; Top Overlay "D21" at 23.368,35.052 h1; Top Overlay "D22" at 23.368,42.545 h1; Top Overlay "TX0" at 23.368,40.005 h1; Top Overlay "RX0" at 23.368,37.465 h1
U2: Bottom Overlay "------" at 49.047,7.315 h1.52 r180
U3: Bottom Overlay "1" at 43.634,24.816 h1
U4: Top Overlay "INT" at 24.447,56.452 h1.14 r90; Top Overlay "VCC" at 6.667,56.452 h1.14 r90; Top Overlay "GND" at 9.207,56.452 h1.14 r90; Top Overlay "SCL" at 11.747,56.452 h1.14 r90; Top Overlay "SDA" at 14.287,56.452 h1.14 r90; Top Overlay "XDA" at 16.828,56.452 h1.14 r90; Top Overlay "XCL" at 19.367,56.452 h1.14 r90; Top Overlay "ADO" at 21.907,56.452 h1.14 r90